# Altium PCB MCU2560.PcbDoc (part 2 of 2)
Units mm, origin at the board's own origin, x right, y up, seen from the top; angles counter-clockwise.
Board outline 76.71 x 57.78 mm, 2 copper layers (Top Layer, Bottom Layer); 79 components, 135 nets, 451 pads, 123 vias.
Unrouted connection lines stored in the file: 2.
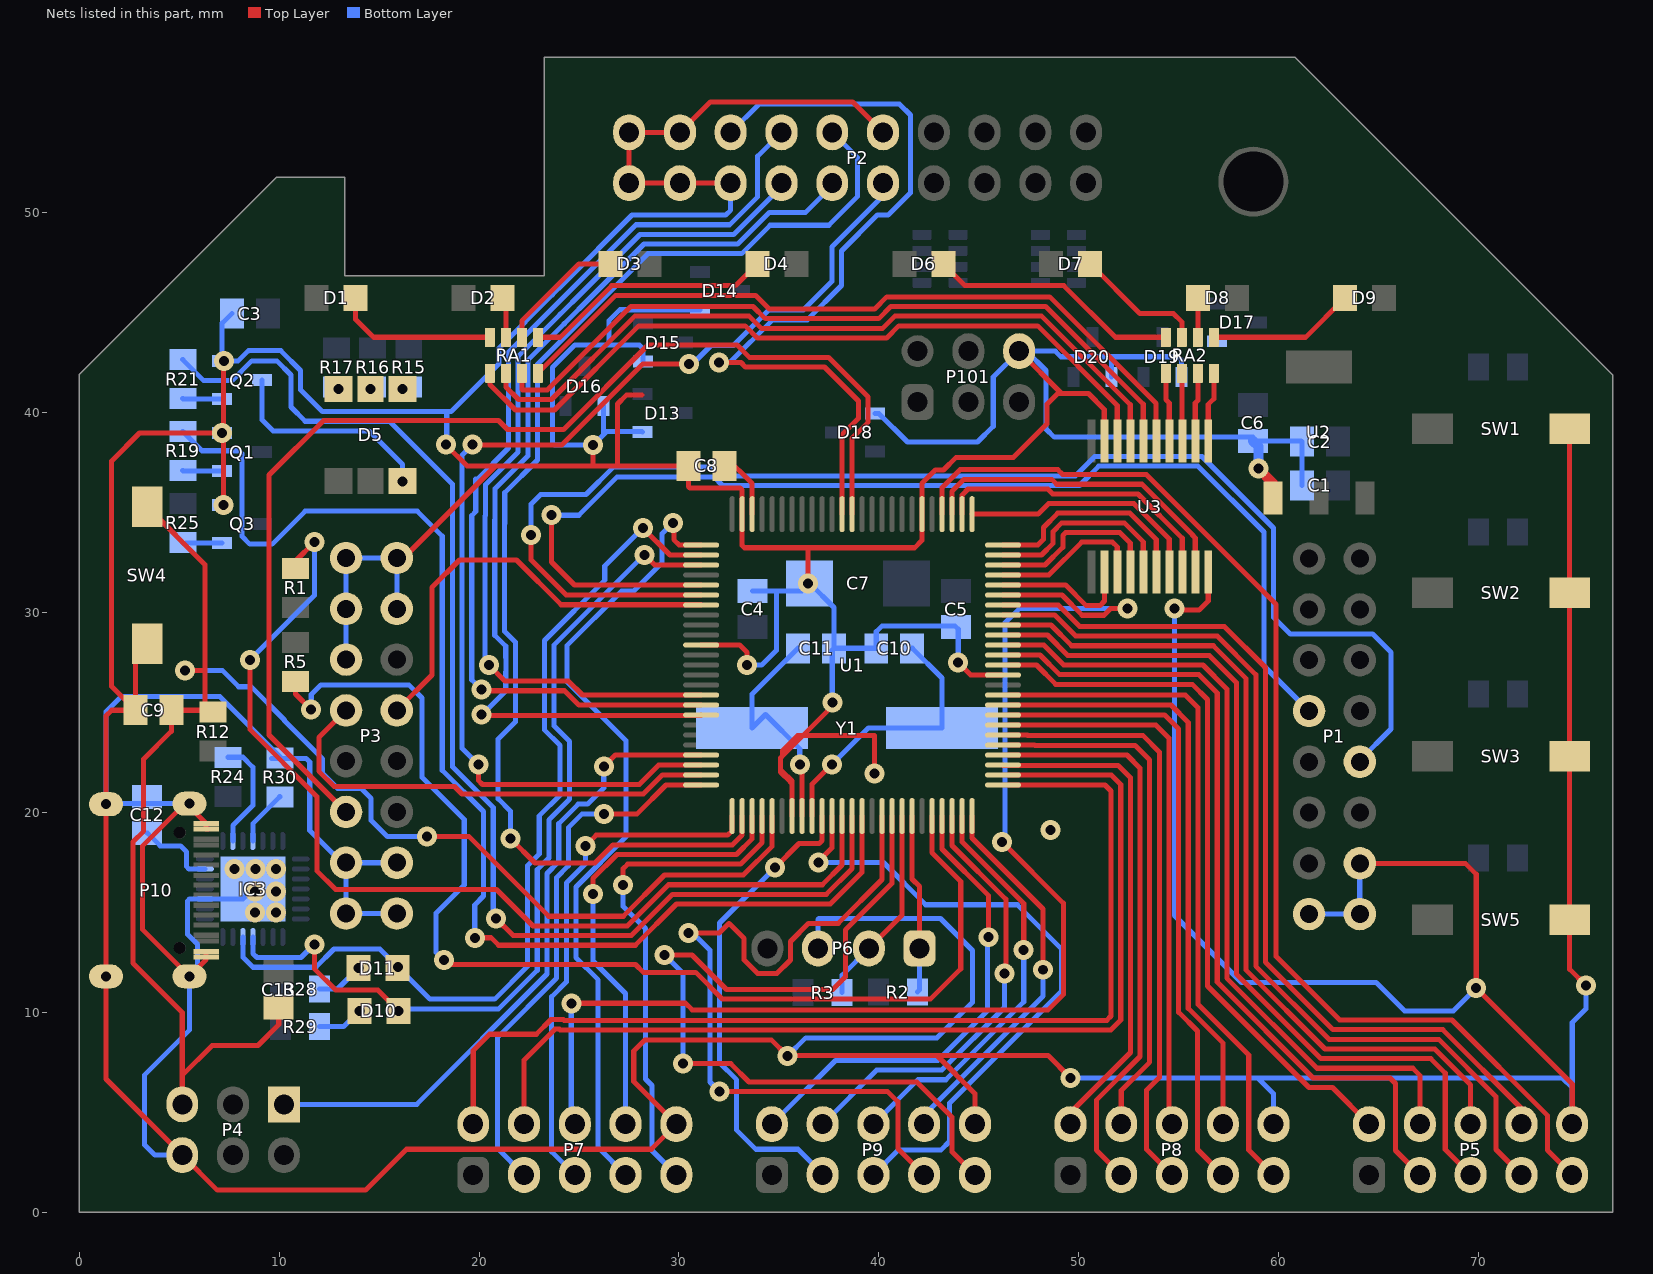
[diagram p2: the nets of this part, all layers, seen from the top]

## Via types
v1: diameter 1, hole 0.5, Top Layer to Bottom Layer, tented both sides, 123 vias

## Nets (pads, with @x,y where several pads share a name; then routed paths per layer and width w, separated by ;. In a path a pad name is that pad's centre, name@x,y a point inside that pad or via, vN(x,y) a via of type N, cw(c..) or ccw(c..) an arc to the next point about the centre after c; other vN are vias at no path point) (continued)
GND: C1.2 C2.2 C3.2 C4.2 C5.2 C6.2 C7.2 C8.2 C9.2 C10.2 C11.2 C12.1 D13.1 D14.1 D15.1 D16.1 D17.1 D18.1 D19.1 D20.1 IC3.3 IC3.29 P1.14 P1.15 P1.16 P2.1 P2.2 P2.3 P2.4 P2.5 P2.12 P3.1 P3.2 P3.3 P3.4 P3.12 P3.13 P3.14 P3.15 P3.16 P4.6 P5.10 P6.3 P7.10 P8.10 P9.10 P10.1 P10.2 P10.15 P10.16 P10.17 P101.6 Q1.2 Q2.2 Q3.2 R30.1 SW1.2 SW2.2 SW3.2 SW4.1 SW5.2 U1.11 U1.32 U1.62 U1.81 U1.99 U2.1 U3.10 U3.19 | length 570
  Top Layer w0.254: SW4.1@3.395,28.448 2.808,27.861 C9.2@2.808,25.121 ; P10.2@6.35,13.056 P10.1@6.35,12.776 6.35,12.649 P10.17@5.512,11.811 3.175,14.148 3.175,18.339 5.283,20.447 P10.17@5.512,20.447 5.512,20.295 P10.16@6.35,19.456 P10.15@6.35,19.177 P10.15@6.477,19.177 ; v1(7.153,38.986) 3.02,38.986 1.626,37.592 1.626,26.303 C9.2@2.808,25.121 ; v1(7.229,35.392) 7.229,42.586 v1(7.239,42.596) ; P3.15@15.886,32.734 16.224,32.734 20.828,37.338 ; v1(18.339,38.405) 19.406,37.338 20.828,37.338 ; v1(25.705,38.379) 25.705,37.414 25.629,37.338 ; 28.159,40.879 27.366,40.879 26.924,40.437 26.924,37.338 ; U1.11@31.109,28.381 33.036,28.381 33.401,28.016 v1(33.401,27.381) ; P2.5@32.586,51.484 P2.3@30.046,51.484 P2.1@27.506,51.484 P2.2@27.506,54.024 P2.4@30.046,54.024 31.572,55.55 38.681,55.55 P2.12@40.206,54.024 ; v1(35.433,7.823) v1@35.408,7.849 ; U1.32@35.659,19.831 35.659,21.44 ; v1(36.449,31.471) 36.449,33.198 36.398,33.249 ; v1(37.668,25.502) 37.668,25.324 36.194,23.85 ; v1(39.776,21.946) 39.776,23.85 36.194,23.85 ; v1(43.967,27.508) 44.594,26.881 U1.62@46.209,26.881 ; P9.10@44.806,4.42 44.806,5.944 42.901,7.849 ; P101.6@47.015,43.078 49.132,40.962 ; v1(49.581,6.731) 48.463,7.849 42.901,7.849 ; U3.19@51.272,38.579 51.272,40.168 50.478,40.962 49.132,40.962 ; v1(54.788,30.201) 54.864,30.124 56.007,30.124 56.472,30.59 U3.10@56.472,32.029 ; P1.14@64.051,17.464 69.328,17.464 69.875,16.916 v1(69.875,11.227) 74.676,6.426 P5.10@74.676,4.42 ; SW1.2@74.549,39.192 SW2.2@74.549,31.005 SW3.2@74.549,22.818 SW5.2@74.549,14.63 74.549,12.167 v1(75.362,11.354) ; C9.2@2.808,25.121 1.626,25.121 1.346,24.841 P10.17@1.346,20.422 P10.17@1.346,11.811 1.346,6.68 P4.6@5.156,2.87 6.909,1.118 14.326,1.118 16.372,3.164 28.615,3.164 P7.10@29.87,4.42 27.737,6.553 27.737,8.077 28.296,8.636 34.62,8.636 v1@35.408,7.849 ; 20.828,37.338 25.629,37.338 ; 25.629,37.338 26.924,37.338 ; 26.924,37.338 C8.2@30.469,37.338 30.469,36.308 30.544,36.232 33.059,36.232 33.159,36.132 U1.99@33.159,34.931 33.159,33.36 33.271,33.249 36.398,33.249 ; 35.077,22.158 35.145,22.09 35.654,21.581 35.654,21.445 35.586,21.513 35.077,22.022 35.077,22.158 ; 35.077,22.158 35.077,22.733 35.187,22.843 ; 35.187,22.843 36.194,23.85 ; 35.187,22.843 35.187,23.112 35.925,23.85 36.194,23.85 ; v1@35.408,7.849 42.901,7.849 ; 36.398,33.249 41.786,33.249 42.159,33.621 U1.81@42.159,34.931 42.159,36.469 42.824,37.135 43.23,37.135 43.865,37.77 46.736,37.77 48.412,39.446 48.412,40.429 48.946,40.962 49.132,40.962
  Top Layer w0.5: v1(58.979,37.211) 59.701,36.488 U2.1@59.701,35.739
  Bottom Layer w0.254: P4.6@5.156,2.87 3.785,2.87 3.277,3.378 3.277,6.883 5.512,9.119 P10.17@5.512,11.811 5.918,11.811 5.918,13.411 5.428,13.902 5.428,15.588 5.52,15.68 IC3.3@6.287,15.68 8.187,15.68 IC3.29@8.687,16.18 ; P10.17@5.512,20.447 1.372,20.447 P10.17@1.346,20.422 1.346,25.044 2.108,25.806 7.036,25.806 R30.1@10.125,22.717 ; Q2.2@7.153,42.596 7.153,44.477 C3.2@7.634,44.958 ; v1(7.239,42.596) 7.954,42.596 8.436,43.078 8.458,43.078 8.484,43.104 10.084,43.104 11.074,42.113 11.074,41.148 12.167,40.056 18.384,40.056 ; R30.1@9.627,22.717 R30.1@10.125,22.717 ; P3.12@13.346,27.654 P3.14@13.346,30.194 P3.16@13.346,32.734 P3.15@15.886,32.734 P3.13@15.886,30.194 ; P3.1@15.886,14.954 P3.2@13.346,14.954 P3.4@13.346,17.494 ; P3.3@15.886,17.494 P3.4@13.346,17.494 ; v1(18.339,38.405) 18.384,38.45 18.384,40.056 ; D16.1@26.223,40.326 26.223,38.898 ; D13.1@28.185,39.03 28.159,39.055 26.38,39.055 26.223,38.898 ; D15.1@28.21,42.56 28.21,43.189 28.016,43.383 26.492,43.383 ; D14.1@31.055,45.151 27.041,45.151 26.492,44.602 26.492,43.383 ; P2.5@32.586,51.484 32.586,50.134 32.338,49.886 27.648,49.886 24.232,46.469 24.232,46.463 23.666,45.898 23.661,45.898 20.993,43.23 20.993,42.456 18.593,40.056 18.384,40.056 ; v1(33.401,27.381) 34.138,27.381 34.874,28.118 34.874,31.075 ; C4.2@33.68,31.075 34.874,31.075 ; v1(35.433,7.823) 36.347,8.738 42.901,8.738 44.679,10.516 44.679,13.106 43.078,14.707 37.008,14.707 36.957,14.656 P6.3@36.957,13.208 ; C7.2@36.143,31.075 34.874,31.075 ; v1(36.449,31.471) C7.2@36.539,31.471 37.755,30.254 C11.2@37.755,28.219 ; v1(37.668,25.502) 37.668,28.132 C11.2@37.755,28.219 ; D18.1@39.811,39.964 39.995,39.964 41.427,38.532 44.933,38.532 45.72,39.319 45.72,41.783 P101.6@47.015,43.078 P101.6@47.396,43.078 ; v1(43.967,27.508) 43.967,29.174 C5.2@43.866,29.275 43.816,29.325 40.145,29.325 39.867,29.047 C10.2@39.867,28.219 C11.2@37.755,28.219 ; v1(49.581,6.731) 58.953,6.731 ; D20.1@51.623,41.799 51.623,42.713 51.537,42.799 ; v1(54.788,30.201) 54.788,14.856 58.137,11.506 64.872,11.506 66.298,10.08 68.728,10.08 v1(69.875,11.227) ; D19.1@55.128,41.799 55.128,42.662 54.991,42.799 51.537,42.799 ; P8.10@59.741,4.42 59.741,5.944 58.953,6.731 ; C1.2@61.152,36.373 C2.2@61.152,38.557 61.112,38.597 C6.2@58.699,38.597 58.699,38.778 48.776,38.778 48.362,39.192 48.362,42.113 P101.6@47.396,43.078 ; P1.15@61.511,14.924 P1.16@64.051,14.924 P1.14@64.051,17.464 ; P5.10@74.676,4.42 74.676,6.248 ; v1(75.362,11.354) 75.362,10.185 74.676,9.5 74.676,6.248 ; R30.1@10.125,22.717 11.344,22.717 11.532,22.53 11.532,19.104 13.142,17.494 P3.4@13.346,17.494 ; 26.223,38.898 v1(25.705,38.379) 23.774,38.379 23.667,38.486 23.667,42.26 24.79,43.383 26.492,43.383 ; P101.6@47.396,43.078 48.819,43.078 49.098,42.799 51.537,42.799 ; 58.953,6.731 74.193,6.731 74.676,6.248
  Bottom Layer w0.5: C6.2@58.699,38.597 58.979,38.318 v1(58.979,37.211)
  other v1: 8.8,15 9.84,15 8.8,16.05 9.84,16.05 7.775,17.175 8.815,17.175 9.855,17.175 48.59,19.126
GREEN: R19.1 U1.39 | length 63.9
  Top Layer w0.254: v1(19.787,13.741) 20.607,13.741 20.98,13.368 27.814,13.368 29.875,15.429 34.041,15.429 34.044,15.426 35.578,15.426 35.581,15.429 37.571,15.429 39.159,17.017 U1.39@39.159,19.831
  Bottom Layer w0.254: R19.1@5.182,39.062 6.144,38.1 8.001,38.1 8.153,37.948 8.153,33.807 8.534,33.426 9.655,33.426 11.306,35.077 16.913,35.077 18.161,33.829 18.161,22.117 20.226,20.051 20.226,15.824 19.787,15.384 v1(19.787,13.741)
ISP_MISO: P4.1 U1.22 | length 32.8
  Top Layer w0.254: v1(26.238,22.301) 26.818,22.881 U1.22@31.109,22.881
  Bottom Layer w0.254: P4.1@10.236,5.41 16.888,5.41 23.401,11.924 23.401,16.956 23.986,17.541 23.986,19.446 24.962,20.422 25.425,20.422 26.238,21.234 v1(26.238,22.301)
L1: U1.71 U3.2 | length 7
  Top Layer w0.254: U1.71@46.209,31.381 49.339,31.381 50.367,30.353 51.054,30.353 51.283,30.582 51.283,32.019 U3.2@51.272,32.029
L2: U1.72 U3.3 | length 7.8
  Top Layer w0.254: U1.72@46.209,31.881 48.493,31.881 50.14,33.528 51.689,33.528 51.922,33.295 U3.3@51.922,32.029
L3: U1.73 U3.4 | length 9.1
  Top Layer w0.254: U1.73@46.209,32.381 48.31,32.381 49.2,33.271 49.2,33.865 49.346,34.011 52.045,34.011 52.572,33.483 U3.4@52.572,32.029
L4: U1.74 U3.5 | length 9.9
  Top Layer w0.254: U1.74@46.209,32.881 48.128,32.881 48.717,33.471 48.717,34.065 49.146,34.493 52.273,34.493 53.222,33.544 U3.5@53.222,32.029
L5: U1.75 U3.6 | length 10.8
  Top Layer w0.254: U1.75@46.209,33.381 47.945,33.381 48.235,33.67 48.235,34.265 48.946,34.976 52.553,34.976 53.872,33.656 U3.6@53.872,32.029
L6: U1.76 U3.7 | length 12.5
  Top Layer w0.254: U1.76@44.659,34.931 47.964,34.931 48.491,35.458 52.752,35.458 54.522,33.689 U3.7@54.522,32.029
L7: U1.77 U3.8 | length 14.8
  Top Layer w0.254: U1.77@44.159,34.931 44.159,35.887 44.176,35.887 44.176,35.904 44.459,36.187 48.446,36.187 48.691,35.941 52.959,35.941 55.172,33.728 U3.8@55.172,32.029
L8: U1.78 U3.9 | length 16.5
  Top Layer w0.254: U1.78@43.659,34.931 43.659,36.069 44.259,36.669 48.645,36.669 48.891,36.424 53.159,36.424 55.655,33.928 55.655,33.906 55.822,33.738 U3.9@55.822,32.029
LED1: RA1.1 U3.18 | length 38.2
  Top Layer w0.254: RA1.1@20.542,41.975 20.542,41.408 21.819,40.132 23.774,40.132 27.991,44.348 33.309,44.348 33.918,43.739 40.386,43.739 40.996,44.348 47.94,44.348 51.922,40.366 U3.18@51.922,38.579
LED2: RA1.2 U3.17 | length 38.1
  Top Layer w0.254: RA1.2@21.342,41.975 21.342,41.291 21.971,40.662 23.622,40.662 27.791,44.831 33.508,44.831 34.118,44.221 40.186,44.221 40.796,44.831 48.14,44.831 52.572,40.398 U3.17@52.572,38.579
LED3: RA1.3 U3.16 | length 38
  Top Layer w0.254: RA1.3@22.142,41.975 22.142,41.173 22.171,41.145 23.422,41.145 27.591,45.314 33.708,45.314 34.318,44.704 39.986,44.704 40.596,45.314 48.34,45.314 53.222,40.431 U3.16@53.222,38.579
LED4: RA1.4 U3.15 | length 37.2
  Top Layer w0.254: RA1.4@22.942,41.975 26.84,45.872 33.832,45.872 34.518,45.187 39.786,45.187 40.396,45.796 48.539,45.796 53.867,40.468 53.867,38.584 U3.15@53.872,38.579
LED5: RA2.1 U3.14 | length 3.5
  Top Layer w0.254: RA2.1@54.35,41.975 54.35,40.665 54.522,40.493 U3.14@54.522,38.579
LED6: RA2.2 U3.13 | length 3.4
  Top Layer w0.254: RA2.2@55.15,41.975 55.15,38.602 U3.13@55.172,38.579
LED7: RA2.3 U3.12 | length 3.4
  Top Layer w0.254: U3.12@55.822,38.579 55.822,40.488 55.95,40.615 RA2.3@55.95,41.975
LED8: RA2.4 U3.11 | length 3.5
  Top Layer w0.254: U3.11@56.472,38.579 56.472,40.419 56.75,40.697 RA2.4@56.75,41.975
NetC8_1: C8.1 U1.98 | length 3.5
  Top Layer w0.254: C8.1@32.294,37.821 33.659,36.456 U1.98@33.659,34.931
NetC10_1: C10.1 U1.34 Y1.1 | length 13.9
  Top Layer w0.254: U1.34@36.659,19.831 36.659,21.419 v1(37.643,22.403)
  Bottom Layer w0.254: v1(37.643,22.403) 39.472,24.232 Y1.1@43.155,24.232 43.155,26.732 C10.1@41.667,28.219
NetC11_1: C11.1 U1.33 Y1.2 | length 11.7
  Top Layer w0.254: v1(36.043,22.403) 36.159,22.287 U1.33@36.159,19.831
  Bottom Layer w0.254: C11.1@35.955,28.219 33.655,25.919 Y1.2@33.655,24.232 34.328,24.905 36.043,23.19 v1(36.043,22.403)
NetC12_2: C12.2 IC3.6 | length 4.1
  Bottom Layer w0.254: C12.2@3.404,18.988 4.053,18.339 5.063,18.339 5.377,18.025 5.377,17.297 5.494,17.18 IC3.6@6.287,17.18
NetD1_2: D1.2 RA1.8 | length 8.2
  Top Layer w0.254: D1.2@13.827,45.745 13.827,44.669 14.721,43.775 RA1.8@20.542,43.775
NetD2_2: D2.2 RA1.7 | length 2
  Top Layer w0.254: D2.2@21.175,45.745 21.342,45.578 RA1.7@21.342,43.775
NetD3_2: D3.2 RA1.6 | length 6.4
  Top Layer w0.254: RA1.6@22.142,43.775 22.142,44.596 24.994,47.447 D3.2@26.573,47.447
NetD4_2: D4.2 RA1.5 | length 12.5
  Top Layer w0.254: RA1.5@22.942,43.775 24.06,43.775 26.64,46.355 32.829,46.355 D4.2@33.921,47.447
NetD5_1: D5.1 R15.2
  other v1: 16.18,41.187
NetD5_3: D5.3 R16.2
  other v1: 14.58,41.187
NetD5_5: D5.5 R17.2
  other v1: 12.98,41.187
NetD6_2: D6.2 RA2.8 | length 12.7
  Top Layer w0.254: D6.2@43.219,47.447 44.311,46.355 49.251,46.355 51.83,43.775 RA2.8@54.35,43.775
NetD7_2: D7.2 RA2.7 | length 6.6
  Top Layer w0.254: D7.2@50.567,47.447 53.056,44.958 54.737,44.958 55.15,44.545 RA2.7@55.15,43.775
NetD8_2: D8.2 RA2.6 | length 1.4
  Top Layer w0.254: RA2.6@55.95,43.775 D8.2@55.95,45.152
NetD9_2: D9.2 RA2.5 | length 7.4
  Top Layer w0.254: RA2.5@56.75,43.775 61.342,43.775 D9.2@63.312,45.745
NetD10_1: D10.1 R29.1 | length 2.5
  Top Layer w0.254: D10.1@13.818,10.084 v1(14.011,10.084)
  Bottom Layer w0.254: R29.1@12.024,9.296 13.224,9.296 v1(14.011,10.084)
NetD11_1: D11.1 R28.1 | length 2.4
  Bottom Layer w0.254: R28.1@12.024,11.176 12.919,11.176 v1(13.96,12.217)
NetIC3_9: IC3.9 R24.2 | length 5.6
  Bottom Layer w0.254: R24.2@7.442,22.768 8.194,22.768 8.687,22.276 8.687,20.36 7.687,19.36 IC3.9@7.687,18.58
NetIC3_11: IC3.11 R30.2 | length 2.8
  Bottom Layer w0.254: IC3.11@8.687,18.58 8.687,19.447 R30.2@10.033,20.793
NetQ1_1: Q1.1 R19.2 | length 2
  Bottom Layer w0.254: R19.2@5.182,37.112 5.207,37.086 Q1.1@7.153,37.086
NetQ2_1: Q2.1 R21.2 | length 2
  Bottom Layer w0.254: R21.2@5.182,40.706 5.207,40.681 Q2.1@7.153,40.681
NetQ3_1: Q3.1 R25.2 | length 2
  Bottom Layer w0.254: R25.2@5.182,33.518 5.207,33.492 Q3.1@7.153,33.492
NetR1_2: R1.2 U1.37 | length 52
  Top Layer w0.254: v1(8.534,27.635) 8.534,24.164 11.887,20.811 11.887,17.094 12.827,16.154 20.879,16.154 22.7,14.334 27.415,14.334 29.475,16.394 34.441,16.394 34.444,16.391 35.152,16.391 35.155,16.394 37.171,16.394 38.159,17.382 U1.37@38.159,19.831 ; R1.2@10.82,32.217 10.82,32.588 v1(11.76,33.528)
  Bottom Layer w0.254: v1(8.534,27.635) 11.76,30.861 v1(11.76,33.528)
NetR5_2: R5.2 U1.46 | length 58.8
  Top Layer w0.254: R5.2@10.82,26.559 10.82,25.933 v1(11.608,25.146) ; v1(18.237,12.624) 18.458,12.403 27.83,12.403 28.219,12.014 30.836,12.014 32.182,10.668 42.57,10.668 44.094,12.192 44.094,16.561 42.659,17.996 U1.46@42.659,19.831
  Bottom Layer w0.254: v1(11.608,25.146) 11.608,25.908 12.09,26.391 16.485,26.391 17.145,25.73 17.145,21.768 19.261,19.652 19.261,16.38 17.856,14.975 17.856,13.005 v1(18.237,12.624)
PB6: P7.3 U1.25 | length 26.9
  Top Layer w0.254: v1(26.238,19.939) 27.908,19.939 29.35,21.381 U1.25@31.109,21.381
  Bottom Layer w0.254: P7.3@22.25,1.88 20.93,3.2 20.93,8.77 23.884,11.724 23.884,16.757 24.468,17.341 24.468,19.246 25.161,19.939 v1(26.238,19.939)
PB7: P7.5 U1.26 | length 26
  Top Layer w0.254: v1(25.324,18.339) 25.857,18.872 32.433,18.872 32.659,19.098 U1.26@32.659,19.831
  Bottom Layer w0.254: P7.5@24.79,1.88 23.635,3.035 23.635,10.792 24.367,11.524 24.367,16.48 25.324,17.437 v1(25.324,18.339)
PC0: P8.2 U1.53 | length 25.2
  Top Layer w0.254: U1.53@46.209,22.381 46.209,22.364 51.957,22.364 52.578,21.742 52.578,7.998 49.581,5 P8.2@49.581,4.42
PC1: P8.3 U1.54 | length 28.9
  Top Layer w0.254: U1.54@46.209,22.881 52.404,22.881 53.061,22.225 53.061,7.798 50.876,5.613 50.876,3.124 P8.3@52.121,1.88
PC2: P8.4 U1.55 | length 26.4
  Top Layer w0.254: U1.55@46.209,23.381 47.784,23.381 47.801,23.364 52.811,23.364 53.543,22.631 53.543,7.518 52.121,6.096 P8.4@52.121,4.42
PC3: P8.5 U1.56 | length 30.1
  Top Layer w0.254: U1.56@46.209,23.881 47.422,23.881 47.439,23.864 53.2,23.864 54.026,23.038 54.026,6.756 53.391,6.121 53.391,3.15 P8.5@54.661,1.88
PC4: P8.6 U1.57 | length 27.9
  Top Layer w0.254: U1.57@46.209,24.381 53.851,24.381 54.508,23.724 54.508,4.572 P8.6@54.661,4.42
PC5: P8.7 U1.58 | length 32.3
  Top Layer w0.254: U1.58@46.209,24.881 54.291,24.881 54.991,24.181 54.991,10.014 55.931,9.074 55.931,3.15 P8.7@57.201,1.88
PC6: P8.8 U1.59 | length 30.4
  Top Layer w0.254: U1.59@46.209,25.381 54.603,25.381 55.474,24.511 55.474,10.214 57.201,8.487 P8.8@57.201,4.42
PC7: P8.9 U1.60 | length 34.9
  Top Layer w0.254: U1.60@46.209,25.881 55.326,25.881 55.956,25.251 55.956,10.414 58.496,7.874 58.496,3.124 P8.9@59.741,1.88
PD4: P9.2 U1.47 | length 23.9
  Top Layer w0.254: U1.47@43.159,19.831 43.159,18.179 45.491,15.846 v1(45.491,13.767)
  Bottom Layer w0.254: P9.2@34.646,4.42 37.832,7.606 42.947,7.606 45.423,10.082 45.423,13.699 v1(45.491,13.767)
PD5: P9.4 U1.48 | length 22.2
  Top Layer w0.254: U1.48@43.659,19.831 43.659,18.361 46.347,15.673 46.347,12.032 v1(46.279,11.963)
  Bottom Layer w0.254: P9.4@37.186,4.42 39.889,7.123 43.147,7.123 46.279,10.255 v1(46.279,11.963)
PD6: P9.6 U1.49 | length 20.6
  Top Layer w0.254: U1.49@44.159,19.831 44.159,18.544 47.244,15.459 v1(47.244,13.132)
  Bottom Layer w0.254: P9.6@39.726,4.42 41.946,6.64 43.347,6.64 47.244,10.538 v1(47.244,13.132)
PD7: P9.8 U1.50 | length 19.3
  Top Layer w0.254: U1.50@44.659,19.831 44.659,18.726 48.209,15.176 v1(48.209,12.141)
  Bottom Layer w0.254: P9.8@42.266,4.42 42.266,4.877 48.209,10.82 v1(48.209,12.141)
PG0: P7.2 U1.51 | length 53.1
  Top Layer w0.254: P7.2@19.71,4.42 19.71,8.103 20.523,8.915 22.863,8.915 23.6,9.652 24.215,9.652 24.258,9.609 51.396,9.609 51.613,9.826 51.613,21.082 51.314,21.381 U1.51@46.209,21.381
PG1: P7.4 U1.52 | length 51.8
  Top Layer w0.254: P7.4@22.25,4.42 22.25,7.62 23.8,9.169 24.015,9.169 24.058,9.127 51.595,9.127 52.095,9.627 52.095,21.412 51.626,21.881 U1.52@46.209,21.881
PG2: P7.6 U1.70 | length 64.3
  Top Layer w0.254: v1(24.613,10.465) 30.328,10.465 30.658,10.135 48.463,10.135 49.225,10.897 49.225,15.469 v1(46.152,18.542) ; U1.70@46.209,30.881 49.156,30.881 50.167,29.87 51.254,29.87 51.584,30.201 v1(52.426,30.201)
  Bottom Layer w0.254: v1(24.613,10.465) 24.613,4.597 P7.6@24.79,4.42 ; v1(46.152,18.542) 46.31,18.7 46.31,29.495 47.015,30.201 v1(52.426,30.201)
PG3: P7.8 U1.28 | length 22.9
  Top Layer w0.254: v1(25.705,15.926) 25.705,16.713 26.899,17.907 32.873,17.907 33.659,18.693 U1.28@33.659,19.831
  Bottom Layer w0.254: v1(25.705,15.926) 25.705,12.573 27.33,10.947 P7.8@27.33,4.42
PG4: P7.9 U1.29 | length 25.2
  Top Layer w0.254: v1(27.203,16.383) 27.203,17.196 27.432,17.424 33.072,17.424 34.159,18.511 U1.29@34.159,19.831
  Bottom Layer w0.254: v1(27.203,16.383) 27.203,15.316 28.321,14.199 28.321,6.68 28.651,6.35 28.651,3.099 P7.9@29.87,1.88
PG5: P7.7 U1.1 | length 41
  Top Layer w0.254: v1(29.693,34.493) 29.693,34.544 29.743,34.595 29.743,33.652 30.014,33.381 U1.1@31.109,33.381
  Bottom Layer w0.254: P7.7@27.33,1.88 25.959,3.251 25.959,11.637 24.849,12.746 24.849,16.28 27.356,18.787 27.356,23.597 24.392,26.56 24.392,28.345 27.125,31.079 27.729,31.079 29.148,32.498 29.148,33.949 v1(29.693,34.493)
PJ0: P5.2 U1.63 | length 36.2
  Top Layer w0.254: U1.63@46.209,27.381 47.879,27.381 48.844,26.416 55.677,26.416 56.439,25.654 56.439,11.323 61.513,6.248 62.687,6.248 P5.2@64.516,4.42
PJ1: P5.3 U1.64 | length 42.1
  Top Layer w0.254: U1.64@46.209,27.881 48.061,27.881 49.044,26.899 56.01,26.899 56.921,25.988 56.921,11.523 61.713,6.731 65.557,6.731 65.837,6.452 65.837,3.099 P5.3@67.056,1.88
PJ2: P5.4 U1.65 | length 40.7
  Top Layer w0.254: U1.65@46.209,28.381 48.244,28.381 49.244,27.381 56.21,27.381 57.404,26.187 57.404,11.723 61.913,7.214 66.7,7.214 67.056,6.858 P5.4@67.056,4.42
PJ3: P5.5 U1.66 | length 45.3
  Top Layer w0.254: U1.66@46.209,28.881 48.426,28.881 49.444,27.864 56.522,27.864 57.887,26.499 57.887,11.923 62.113,7.696 67.599,7.696 68.326,6.97 68.326,3.15 P5.5@69.596,1.88
PJ4: P5.6 U1.67 | length 43.4
  Top Layer w0.254: U1.67@46.209,29.381 48.609,29.381 49.644,28.346 56.722,28.346 58.369,26.699 58.369,12.122 62.313,8.179 67.799,8.179 69.596,6.382 P5.6@69.596,4.42
PJ5: P5.7 U1.68 | length 47.6
  Top Layer w0.254: U1.68@46.209,29.881 48.791,29.881 49.844,28.829 56.921,28.829 58.852,26.899 58.852,12.322 62.513,8.661 67.999,8.661 70.866,5.795 70.866,3.15 P5.7@72.136,1.88
PJ6: P5.8 U1.69 | length 45.8
  Top Layer w0.254: U1.69@46.209,30.381 48.974,30.381 50.044,29.312 57.277,29.312 59.334,27.254 59.334,12.522 62.713,9.144 68.199,9.144 72.136,5.207 P5.8@72.136,4.42
PJ7: P5.9 U1.79 | length 59.2
  Top Layer w0.254: U1.79@43.159,34.931 43.159,36.252 44.059,37.152 48.944,37.152 49.19,36.906 53.373,36.906 59.868,30.412 59.868,12.802 63.043,9.627 68.663,9.627 73.431,4.858 73.431,3.124 P5.9@74.676,1.88
PL0: P9.3 U1.35 | length 24.1
  Top Layer w0.254: v1(34.798,17.247) 36.001,18.45 37.01,18.45 37.159,18.599 U1.35@37.159,19.831
  Bottom Layer w0.254: v1(34.798,17.247) 32.029,14.478 32.029,7.493 32.885,6.637 32.885,4.158 32.868,4.14 33.844,3.164 35.952,3.164 37.186,1.93 P9.3@37.186,1.88
PL1: P9.5 U1.36 | length 33.2
  Top Layer w0.254: v1(36.982,17.501) 36.982,17.561 37.659,18.237 U1.36@37.659,19.831
  Bottom Layer w0.254: v1@36.779,17.501 v1(36.982,17.501) 40.234,17.501 42.342,15.392 46.923,15.392 49.124,13.192 49.124,11.052 43.536,5.464 43.536,3.556 43.115,3.135 40.981,3.135 P9.5@39.726,1.88
PL6: P9.7 U1.41 | length 39.2
  Top Layer w0.254: v1(30.48,13.97) 32.004,13.97 32.498,14.464 33.261,13.7 33.261,12.629 33.938,11.952 34.896,11.952 35.573,12.629 35.573,13.558 36.478,14.464 37.971,14.464 40.159,16.652 U1.41@40.159,19.831 ; v1(32.029,6.045) 40.437,6.045 40.945,5.537 40.945,3.2 P9.7@42.266,1.88
  Bottom Layer w0.254: v1(30.48,13.97) 30.699,13.97 31.547,13.123 31.547,6.528 v1(32.029,6.045)
PL7: P9.9 U1.42 | length 42.8
  Top Layer w0.254: v1(29.286,12.878) 30.654,12.878 32.382,11.151 37.694,11.151 38.329,11.786 38.329,14.139 40.659,16.469 U1.42@40.659,19.831 ; v1(30.201,7.442) 32.588,7.442 33.503,6.528 41.892,6.528 43.65,4.769 43.65,3.828 43.663,3.816 43.663,3.023 P9.9@44.806,1.88
  Bottom Layer w0.254: v1(29.286,12.878) 30.201,11.963 v1(30.201,7.442)
PWM1: P1.7 U1.5 | length 58.6
  Top Layer w0.254: v1(23.622,34.874) 23.622,32.537 24.778,31.381 U1.5@31.109,31.381
  Bottom Layer w0.254: v1(23.622,34.874) 24.987,34.874 26.909,36.797 31.739,36.797 32.174,36.362 50.027,36.362 50.996,37.33 55.961,37.33 59.258,34.033 59.258,27.337 P1.7@61.511,25.084
PWM2: P1.10 U1.6 | length 69.2
  Top Layer w0.254: v1(22.606,33.884) 22.606,32.639 24.364,30.881 U1.6@31.109,30.881
  Bottom Layer w0.254: v1(22.606,33.884) 22.606,35.433 23.089,35.916 25.346,35.916 26.709,37.279 31.939,37.279 32.374,36.844 49.828,36.844 50.796,37.813 56.161,37.813 59.741,34.233 59.741,29.769 60.579,28.931 64.694,28.931 65.608,28.016 65.608,24.181 64.051,22.624 P1.10@64.051,22.544
PWM3: P3.9 U1.7 | length 21.8
  Top Layer w0.254: P3.9@15.886,25.114 17.653,26.881 17.653,31.267 19.025,32.639 21.869,32.639 24.113,30.396 31.094,30.396 U1.7@31.109,30.381
R: D5.2 Q2.3 | length 10.8
  Top Layer w0.254: v1(16.18,36.551) D5.2@16.18,36.587
  Bottom Layer w0.254: Q2.3@9.153,41.631 9.153,39.64 9.703,39.091 14.503,39.091 16.18,37.414 v1(16.18,36.551)
RED: R21.1 U1.38 | length 62.6
  Top Layer w0.254: v1(20.853,14.707) 21.709,13.851 27.614,13.851 29.675,15.911 34.241,15.911 34.244,15.908 35.352,15.908 35.355,15.911 37.371,15.911 38.659,17.199 U1.38@38.659,19.831
  Bottom Layer w0.254: R21.1@5.182,42.656 6.233,41.605 7.645,41.605 8.636,42.596 9.881,42.596 10.592,41.885 10.592,40.284 11.303,39.573 15.519,39.573 18.669,36.424 18.669,22.291 20.709,20.251 20.709,14.851 v1(20.853,14.707)
RESET: C9.1 C13.1 P4.5 R12.1 SW4.2 U1.30 | length 81.5
  Top Layer w0.254: SW4.2@3.395,35.306 6.299,32.402 6.299,27.178 ; P4.5@5.156,5.41 5.156,6.858 ; v1(5.283,27.102) 6.223,27.102 6.299,27.178 ; R12.1@6.706,25.029 R12.1@6.614,25.121 ; C13.1@9.982,10.251 9.982,9.398 8.941,8.357 6.655,8.357 5.156,6.858 ; v1(17.399,18.796) 19.507,18.796 23.487,14.816 27.215,14.816 29.275,16.877 33.218,16.877 34.659,18.317 U1.30@34.659,19.831 ; 5.156,6.858 5.156,10.005 2.692,12.469 2.692,18.539 3.227,19.074 3.227,22.684 4.608,24.065 C9.1@4.608,25.121 R12.1@6.614,25.121 ; 6.299,27.178 6.299,25.435 R12.1@6.614,25.121
  Bottom Layer w0.254: v1(5.283,27.102) 7.175,27.102 7.98,26.297 8.603,26.297 10.27,24.63 10.27,24.592 12.178,22.683 12.178,21.96 12.935,21.202 14.104,21.202 14.605,20.701 14.605,19.609 15.418,18.796 v1(17.399,18.796)
RX: D11.2 IC3.26 U1.2 | length 46
  Top Layer w0.254: v1(28.194,34.239) 29.552,32.881 U1.2@31.109,32.881
  Bottom Layer w0.254: IC3.26@8.191,13.78 8.191,12.767 8.69,12.268 11.836,12.268 12.751,13.183 15.037,13.183 v1(15.951,12.268) 17.551,10.668 20.781,10.668 22.428,12.316 22.428,17.348 23.012,17.932 23.012,19.837 24.046,20.871 24.046,23.367 23.266,24.146 23.266,26.218 23.276,26.227 23.276,28.613 26.289,31.626 26.289,32.334 v1(28.194,34.239)
SCL: P6.2 R3.1 U1.43 | length 10.1
  Top Layer w0.254: P6.2@39.497,13.208 41.159,14.87 U1.43@41.159,19.831
  Bottom Layer w0.254: R3.1@38.161,10.998 38.161,11.872 P6.2@39.497,13.208
SDA: P6.1 R2.1 U1.44 | length 9
  Top Layer w0.254: U1.44@41.659,19.831 41.659,16.685 42.037,16.307 P6.1@42.037,13.208
  Bottom Layer w0.254: R2.1@41.92,11.024 42.037,11.141 P6.1@42.037,13.208
SERVO: P3.10 U1.24 | length 23.6
  Top Layer w0.254: P3.10@13.346,25.114 11.989,23.756 11.989,22.074 12.752,21.311 18.771,21.311 19.152,20.93 28.216,20.93 29.168,21.881 U1.24@31.109,21.881
SPK: P2.11 U1.23 | length 57.5
  Top Layer w0.254: v1(19.685,38.405) 19.685,38.659 19.406,38.379 24.13,38.379 28.194,42.443 v1(30.505,42.443) ; v1(19.964,22.403) 19.964,21.615 20.168,21.412 28.016,21.412 28.985,22.381 U1.23@31.109,22.381
  Bottom Layer w0.254: v1(19.685,38.405) 19.152,37.871 19.152,23.216 v1(19.964,22.403) ; v1(30.505,42.443) 30.505,42.266 31.605,43.366 32.717,43.366 34.487,45.136 36.216,45.136 37.644,46.564 37.644,48.293 40.206,50.855 P2.11@40.206,51.484
STEER_VR: P3.6 U1.88 | length 58.7
  Top Layer w0.254: P3.6@13.346,20.034 9.5,23.881 9.5,36.881 12.235,39.616 20.97,39.616 21.419,39.167 24.235,39.167 28.451,43.383 32.909,43.383 33.518,42.774 37.475,42.774 39.464,40.785 39.464,39.527 38.659,38.722 U1.88@38.659,34.931
SW1: P2.7 U1.16 | length 45
  Top Layer w0.254: v1(20.49,27.391) 21.304,26.576 24.478,26.576 25.173,25.881 U1.16@31.109,25.881
  Bottom Layer w0.254: v1(20.49,27.391) 20.49,27.243 20.555,27.178 v1@20.742,27.365 ; v1@20.752,27.356 v1@20.742,27.365 ; P2.7@35.126,51.484 35.126,51.31 32.737,48.92 28.048,48.92 25.197,46.069 25.197,46.063 24.066,44.933 24.06,44.933 21.958,42.83 21.958,38.04 20.32,36.402 20.32,34.855 20.303,34.838 20.303,27.805 v1@20.742,27.365
SW2: P2.8 U1.17 | length 48.6
  Top Layer w0.254: v1(20.117,26.162) 20.185,26.094 24.278,26.094 24.99,25.381 U1.17@31.109,25.381
  Bottom Layer w0.254: v1(20.117,26.162) 19.634,26.645 19.634,34.852 19.837,35.055 19.837,36.678 19.914,36.678 21.476,38.24 21.476,43.03 23.861,45.415 23.866,45.415 24.714,46.263 24.714,46.269 27.848,49.403 32.537,49.403 33.934,50.8 33.934,52.832 P2.8@35.126,54.024
SW3: P2.9 U1.18 | length 49.2
  Top Layer w0.254: v1(20.117,24.917) 20.17,24.864 31.091,24.864 U1.18@31.109,24.881
  Bottom Layer w0.254: v1(20.117,24.917) 20.168,24.917 21.336,26.086 21.336,27.027 21.345,27.036 21.345,27.745 21.336,27.754 21.336,28.321 20.785,28.872 20.785,34.638 20.803,34.655 20.803,36.202 22.441,37.84 22.441,42.631 24.26,44.45 24.266,44.45 25.679,45.864 25.679,45.869 28.248,48.438 32.937,48.438 34.525,50.025 36.335,50.025 37.666,51.357 P2.9@37.666,51.484
SW4: P2.10 U1.27 | length 62.1
  Top Layer w0.254: v1(21.565,18.694) 21.59,18.694 22.801,17.483 25.792,17.483 26.699,18.39 32.673,18.39 33.159,18.876 U1.27@33.159,19.831
  Bottom Layer w0.254: v1(21.565,18.694) 21.565,20.078 20.955,20.688 20.955,23.682 21.819,24.546 21.819,26.827 21.828,26.836 21.828,27.945 21.819,27.954 21.819,28.521 21.268,29.072 21.268,34.438 21.285,34.455 21.285,36.002 22.924,37.64 22.924,42.431 24.46,43.967 24.466,43.967 26.162,45.664 26.162,45.669 28.448,47.955 33.137,47.955 34.559,49.378 37.49,49.378 38.938,50.825 38.938,52.752 P2.10@37.666,54.024
TX: D10.2 IC3.25 U1.3 | length 45.2
  Top Layer w0.254: v1(11.76,13.411) 11.76,12.192 12.827,11.125 14.935,11.125 v1(15.977,10.084) ; v1@28.27,33.045 v1(28.27,32.893) 28.782,32.381 U1.3@31.109,32.381
  Bottom Layer w0.254: IC3.25@8.693,13.78 8.693,12.948 8.89,12.751 11.1,12.751 v1(11.76,13.411) ; v1(15.977,10.084) 16.078,10.185 20.98,10.185 22.911,12.116 22.911,17.148 23.495,17.733 23.495,19.638 24.528,20.671 24.528,23.567 23.749,24.346 23.749,26.009 23.758,26.018 23.758,28.394 28.257,32.893 v1(28.27,32.893)
VBAT: P2.6 U1.89 | length 41.6
  Top Layer w0.254: v1(32.004,42.51) 33.1,42.51 33.319,42.291 37.275,42.291 38.981,40.585 38.981,39.727 38.159,38.905 U1.89@38.159,34.931
  Bottom Layer w0.254: v1(32.004,42.51) 32.544,42.51 34.687,44.653 36.416,44.653 38.127,46.364 38.127,48.093 39.919,49.886 40.462,49.886 41.58,51.003 41.58,54.889 41.021,55.448 34.011,55.448 P2.6@32.586,54.024
pads on no net: D13.2 D14.2 D15.2 D16.2 D17.2 D18.2 D19.2 D20.2 IC3.1 IC3.2 IC3.10 IC3.12 IC3.13 IC3.14 IC3.15 IC3.16 IC3.17 IC3.18 IC3.19 IC3.20 IC3.21 IC3.22 IC3.23 IC3.24 IC3.27 P10.5 P10.6 P10.11 P10.12 P10.18 P10.19

## Polygon pours and split planes (outlines as drawn)
GND on Top Layer "GND_L01_P003" (solid, remove dead copper, pour order 3): 0,41.885 0,41.91 9.881,51.791 13.284,51.791 13.284,46.863 23.266,46.863 23.266,57.785 60.808,57.785 76.708,41.885 76.708,0 0,0
GND on Bottom Layer "GND_L02_P005" (solid, remove dead copper, pour order 5): 0,41.885 0,41.91 9.881,51.791 13.284,51.791 13.284,46.863 23.266,46.863 23.266,57.785 60.808,57.785 76.708,41.885 76.708,0 0,0

## Keep-outs
Keep-Out Layer:
  lines w0.254: 0,0 0,41.885 0,41.91 9.881,51.791 13.284,51.791 13.284,46.863 23.266,46.863 23.266,57.785 60.72,57.785 60.808,57.785 76.708,41.885 76.708,0 0,0

## Other copper
Top Layer:
  rectangle net GND: 7.725,14.375 8.688,17.834
  rectangle net GND: 8.275,14.075 10.75,18.15

## Silkscreen, mask and mechanical layers (free items; w line width, h text height)
Top Overlay:
  circle w0.254: c58.725,51.562 r2.058
  circle w0.254: c58.725,51.562 r3.251
  lines w0.5: 0.279,0.254 76.479,0.254 76.479,41.783 60.681,57.582 23.698,57.582 23.571,57.455 23.571,46.533 13.183,46.533 12.979,46.736 12.979,51.486 10.033,51.486 0.279,41.732 0.279,41.707 0.279,0.254
  text "SW1" at 68.326,41.631 h3
  text "MEGA2560" at 33.299,36.551 h2.5
  text "RESET" at 5.817,35.611 h3 r270
  text "SW2" at 68.351,33.376 h3
  text "SW3" at 68.428,25.248 h3
  text "USB" at 10.475,18.05 h2 r270
  text "SW4" at 68.402,16.84 h3
  text "I2C LCD" at 33.858,16.053 h2.5
  text "LED" at 17.9,9.5 h1.5 r90
  text "RST" at 3.3,8.943 h1.5
  text "PORT3" at 53.85,5.825 h2.5
  text "PORT4" at 68.85,5.825 h2.5
  text "PORT1" at 24.1,5.8 h2.5
  text "PORT2" at 38.825,5.8 h2.5
  text "ISP" at 15.621,5.537 h2.5 r270